# Altium PCB COPY.PcbDoc
Units mil, origin at the board's own origin, x right, y up, seen from the top; angles counter-clockwise.
Board outline 1320.03 x 2103.03 mil, 2 copper layers (Top Layer, Bottom Layer); 21 components, 11 nets, 54 pads, 4 vias.
Unrouted connection lines stored in the file: 10.
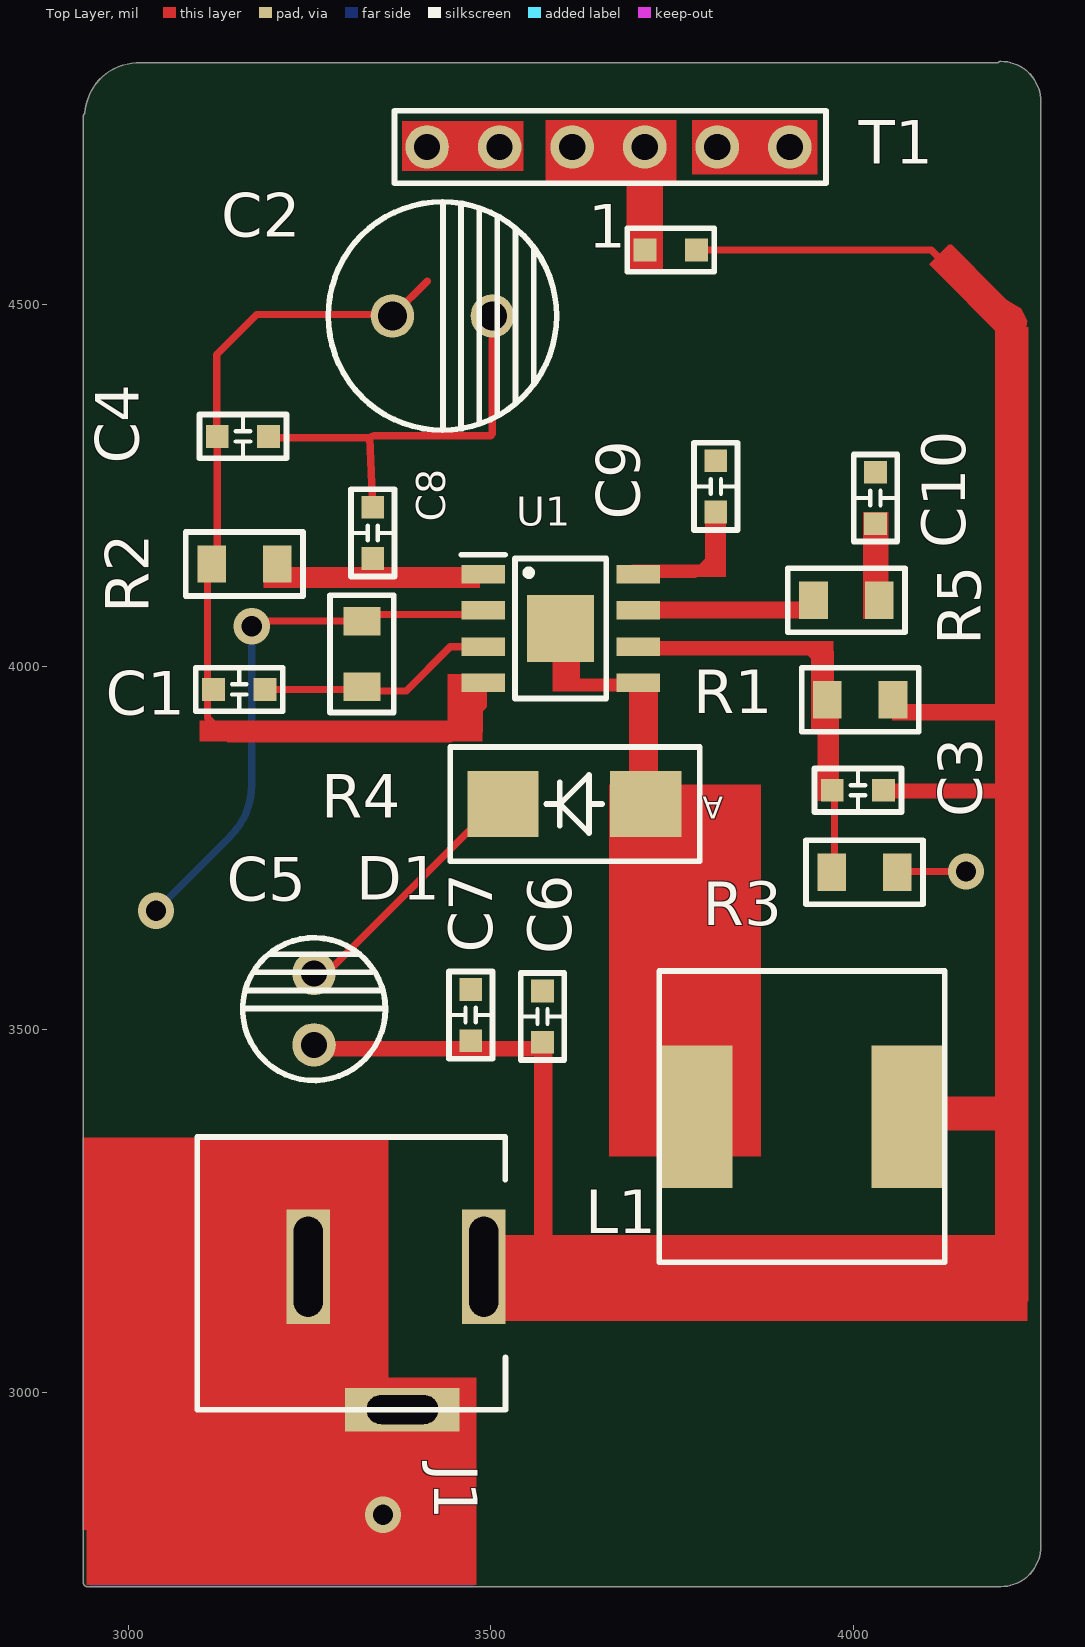
[diagram p0: Top Layer view]
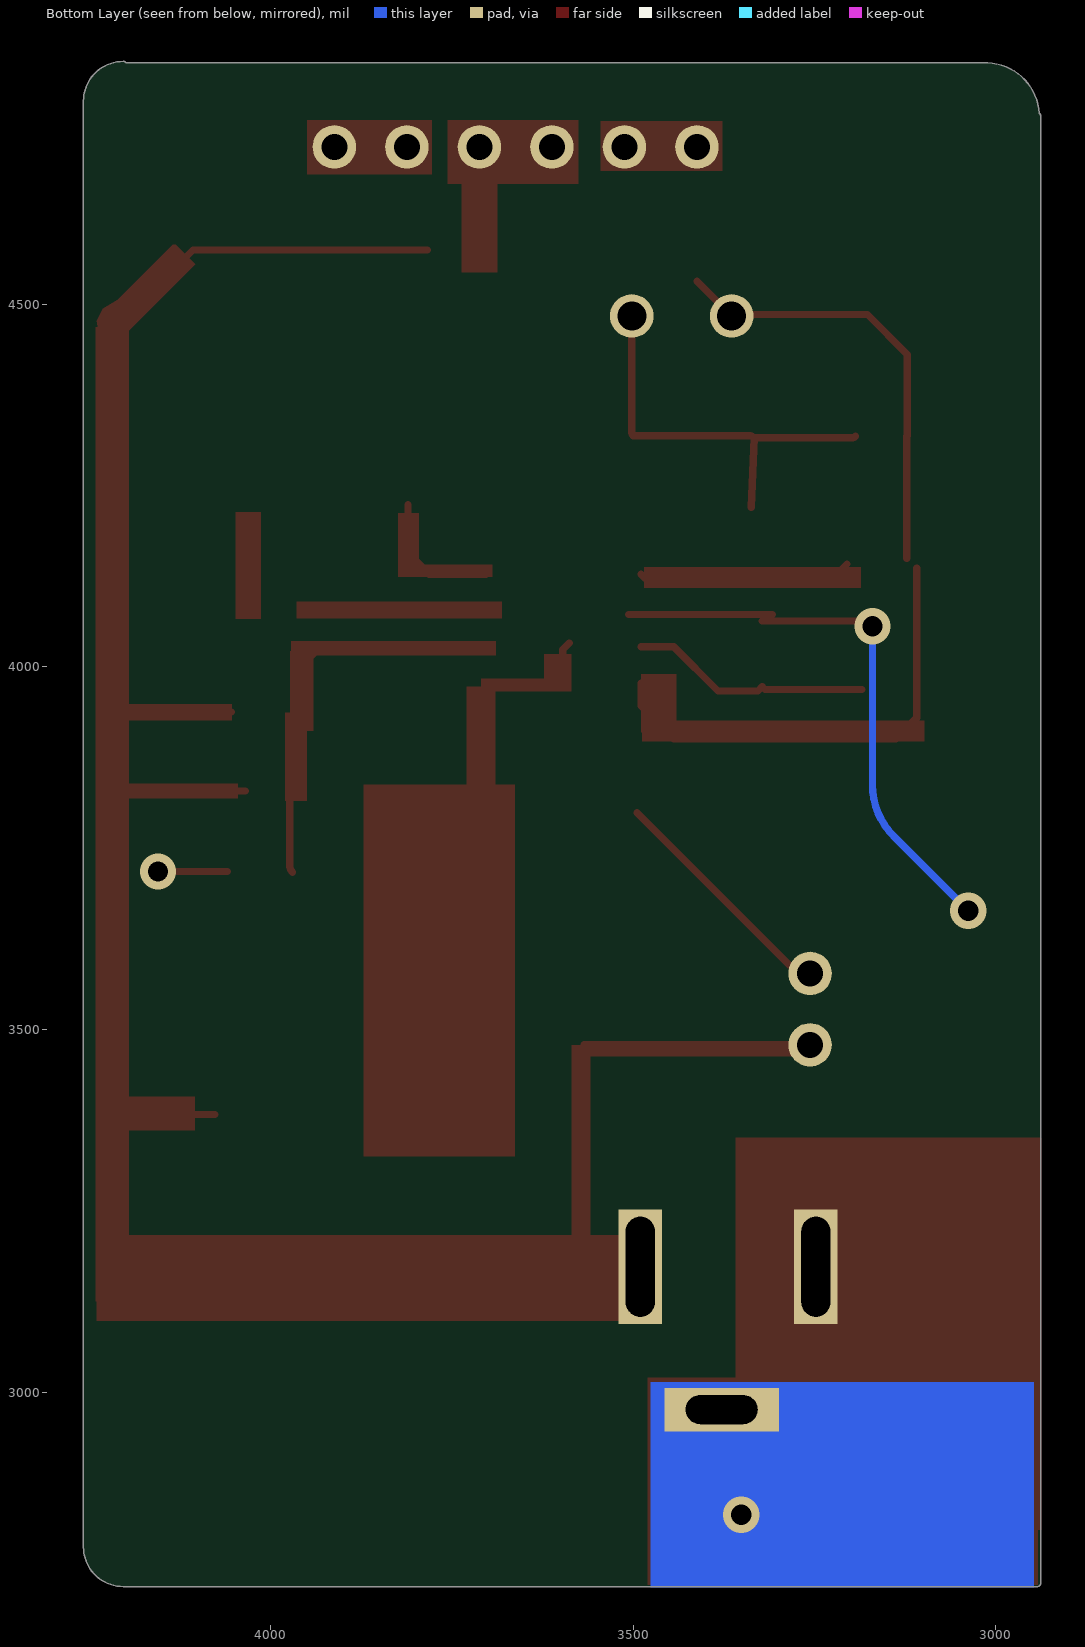
[diagram p1: Bottom Layer view, seen from below]
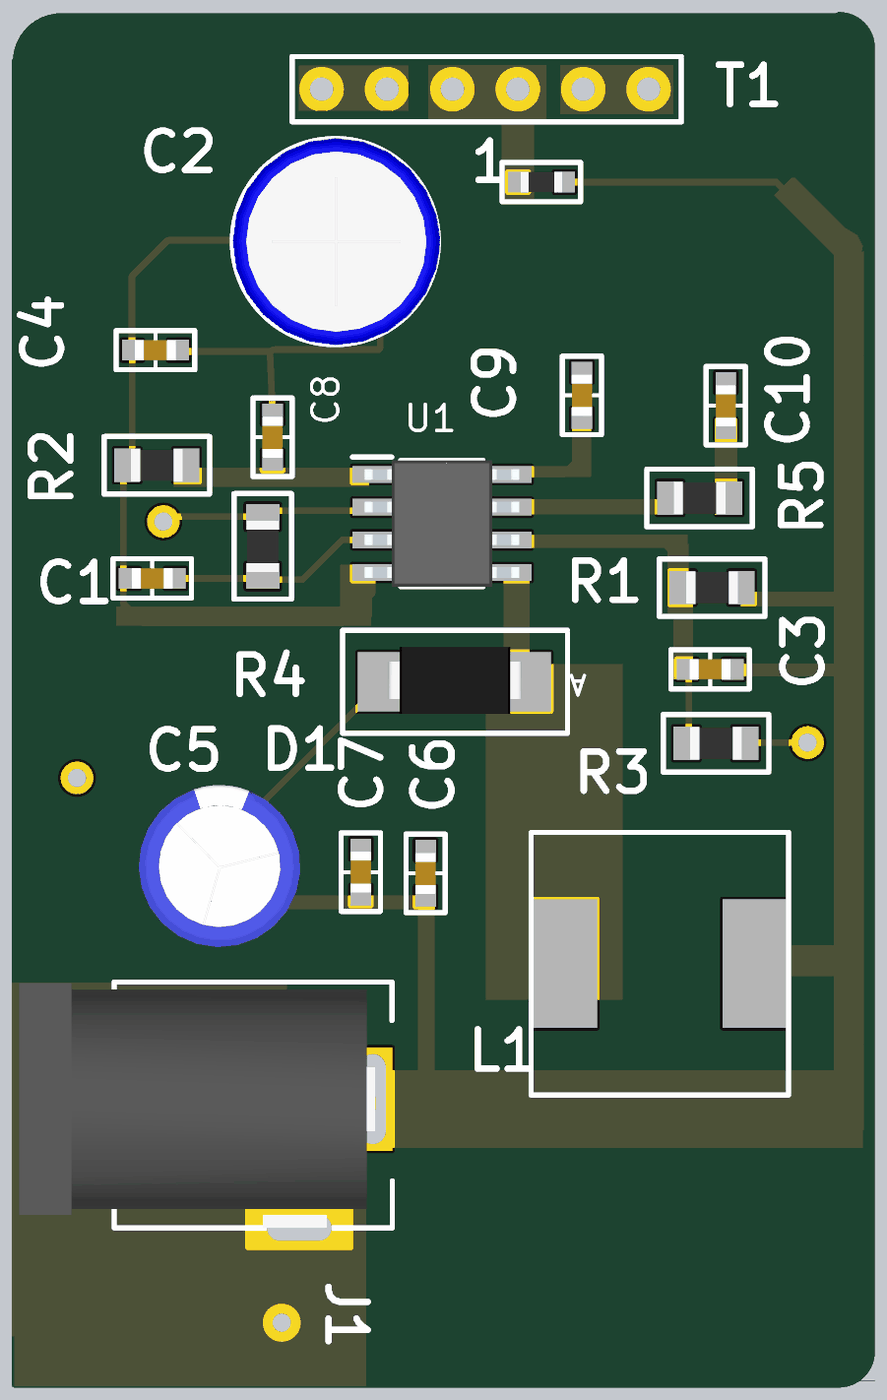
[diagram p2: 3D render of the assembled board from above, using the file's embedded part models]

## Layer stack, top to bottom
Top Solder: solder mask 0.4, Solder Resist, Dk 3.5
Top Layer: signal copper 1.4
Dielectric 1: dielectric 12.6, FR-4, Dk 4.8
Bottom Layer: signal copper 1.4
Bottom Solder: solder mask 0.4, Solder Resist, Dk 3.5

## Board outline
2937.99,2737 ccw(c2943,2737) 2943,2731.99 4203,2731.99 ccw(c4203,2787) 4258.02,2787 4258.02,4780 ccw(c4203,4780) 4203,4835.02 ccw(c4203,4830) 4198.99,4833.02 3011.71,4833.02 ccw(c3011.71,4828) 3011.01,4832.97 ccw(c3013.71,4759.38) 2940.19,4763.53 ccw(c2943,4759.38) 2937.99,4759.38

## Design rules (kind name [scope] priority, off if disabled: settings)
Clearance [All] p1: gap=10
PolygonConnect [All] p1: connectstyle=Relief reliefconductorwidth=10 reliefentries=4 polygonreliefangle="90 Angle" airgapwidth=10
RoutingVias [All] p1: holewidth=28 width=50 viastyle="Through Hole" minholewidth=28 minwidth=50 maxholewidth=28 maxwidth=50
SilkToBoardRegionClearance [All] p1 off:
SilkToSilkClearance [All] p1 off: silktosilkclearance=10
SolderMaskExpansion [All] p1: expansion=4
Width [All] p1: maxlimit=10 minlimit=10 preferedwidth=10
28 further rules are at their usual default settings.

## Components (designator, comment, footprint, x,y, rotation, side; value= is the part's Value field where it differs from the comment)
1 "R10" R_0603 3748,4575 r180 top
C1 "C0603" C_0603 3153,3969 r180 top
C2 "CAP" "CAP_ALLU 3.5mm" 3433,4484 r0 top
C3 "C0603" C_0603 4006,3830 r180 top
C4 "C0603" C_0603 3158,4318 r0 top
C5 "CAP" "CAP_ALLU 2.5mm" 3256,3479 r90 top
C6 "C0603" C_0603 3571,3518 r90 top
C7 "C0603" C_0603 3472,3520 r90 top
C8 "C0603" C_0603 3337,4184.88 r270 top
C9 "C0603" C_0603 3810,4249 r90 top
C10 "C0603" C_0603 4030,4233 r90 top
D1 "DIODE" Diode_SMB 3615,3811 r180 top
J1 "CONN JACK PWR" "DC Power Socket" 3248,3173 r180 top
L1 "INDUCTOR IRON/SM" Inductor 3929,3380 r0 top
R1 "RESISTOR" R_0805 4009,3954.9 r180 top
R2 "RESISTOR" R_0805 3160,4142 r0 top
R3 "RESISTOR" R_0805 4015,3717 r0 top
R4 "RESISTOR" R_0805 3322,4018 r90 top
R5 "RESISTOR" R_0805 3990,4092 r0 top
T1 "1X3PIN" HDR1X6_2.54mm 3912,4717 r180 top
U1 "AX3162" SO8E 3596,4053 r0 top

## Footprints (in the part's own frame and the unit in brackets; to place one, negate y for a bottom-side part, rotate by r counter-clockwise, add the part's x,y. Pads: shape width x height; smd on the part's side, far side on the other; paste and mask are expansions set on the pad)
C_0603 [mm]
  rect 0.8x0.8 smd: 1(-0.9,0) 2(0.9,0)
  silkscreen extent -1.52,-0.76 1.52,0.76, body extent -0.8,-0.4 0.8,0.4, height 0.9
"CAP_ALLU 2.5mm" [mil]
  round 60 hole 36: 1(0,0) 2(98.43,0)
  silkscreen extent -49,-98 148,98, body extent -74,-124 174,124, height 504
"CAP_ALLU 3.5mm" [mil]
  round 60 hole 40: 1(-68.9,0) 2(68.9,0)
  silkscreen extent -157,-157 157,157, body extent -157,-158 160,158, height 473
"DC Power Socket" [mil]
  rect 60x158 hole 40 slot 137.8 at 90 deg: 1(-242.13,0) 2(0,0)
  rect 158x60 hole 40 slot 99 at 0 deg: 3(-129.92,196.85)
  silkscreen extent -272,-179 153,197, body extent -246,-177 298,197, height 433
Diode_SMB [mm]
  rect 2.5x2.3 smd: 1(-2.5,0) 2(2.5,0)
  silkscreen extent -4.39,-2 4.34,2, body extent -2.62,-1.36 2.57,1.24, height 2.18
HDR1X6_2.54mm [mil] "Connector; Header; 6 Position"
  round 60 hole 36: 1(0,0) 2(100,0) 3(200,0) 4(300,0) 5(400,0) 6(500,0)
  silkscreen extent -50,-50 545,50
Inductor [mm] "Inductor 10.20 x 10"
  rect 2.5x5 smd: 1(-3.683,0) 2(3.683,0)
  silkscreen extent -5,-5.1 5,5.1, body extent -4.83,-4.95 4.83,4.95, height 5.1
R_0603 [mm] "RES SMD 0603"
  rect 0.8x0.8 smd: 1(-0.9,0) 2(0.9,0)
  silkscreen extent -1.52,-0.76 1.52,0.76, body extent -0.8,-0.4 0.8,0.4, height 0.4
R_0805 [mm] "RES SMD 0805"
  rect 1x1.3 smd: 1(-1.15,0) 2(1.15,0)
  silkscreen extent -2.05,-1.12 2.05,1.12, body extent -1,-0.62 1,0.63, height 0.5
SO8E [mm]
  rect 1.525x0.65 smd: 1(-2.712,1.905) 2(-2.712,0.635) 3(-2.712,-0.635) 4(-2.712,-1.905) 5(2.712,-1.905) 6(2.712,-0.635) 7(2.712,0.635) 8(2.712,1.905)
  rect 2.34x2.34 smd: 9(0,0)
  silkscreen extent -3.47,-2.45 1.6,2.58, body extent -3,-2.45 3,2.45, height 1.75

## Part data
1: library part RESISTOR

## Via types
v1: diameter 50, hole 28, Top Layer to Bottom Layer, 4 vias

## Nets (pads, with @x,y where several pads share a name; then routed paths per layer and width w, separated by ;. In a path a pad name is that pad's centre, name@x,y a point inside that pad or via, vN(x,y) a via of type N, cw(c..) or ccw(c..) an arc to the next point about the centre after c; other vN are vias at no path point)
12V: 1.1 C3.1 C5.1 C6.1 C7.1 J1.1 L1.2 R1.1 | length 3643.1
  Top Layer w10: C5.1 3567.43,3479 3567.43,3160.43 3566,3159 ; J1.1 3490.13,3159.13 3490.25,3159 3566,3159 ; 1.1 4107,4575 4219,4463 4219,3159 3566,3159 ; C3.1@4034.43,3829 4215,3829 ; R1.1@4054.28,3938 4218,3938 ; L1.2@4077,3383 4215,3383
GND: C2.2 C4.2 C5.2 C6.2 C7.2 C8.1 C9.2 C10.2 D1.2 J1.2 J1.3 R3.2 R4.2 T1.1 T1.2 U1.2 | length 1966.6
  Top Layer w10: v1(3170,4056) 3180,4056 3187.28,4063.28 R4.2 ; C4.2 ccw(c3198.26,4322.83) 3198.26,4316 3333,4316 ; C5.2 ccw(c3256,3618.47) 3285.02,3589.45 D1.2@3494.57,3799 ; R4.2@3308,4072.28 U1.2@3506,4072.28 ; C8.1 3333,4316 ; v1(3351,2831) 3351,2837 3377.92,2863.92 J1.3 ; C2.2 3501.9,4323.58 cw(c3495.42,4323.58) 3500,4319 3340.24,4319 ccw(c3340.24,4308.76) 3333,4316 ; R3.2@4059.28,3718 v1(4155,3718)
  Bottom Layer w10: v1(3038,3664) 3140.71,3766.71 ccw(c3070,3837.42) 3170,3837.42 v1(3170,4056) ; C5.2@3248,3558.11 cw(c3275.31,3558.11) C5.2
Net1_2: 1.2 T1.3 T1.4 | length 244.4
  Top Layer w10: T1.4 T1.3 3714,4715 1.2@3714,4573.43
NetC1_1: C1.1 R4.1 U1.3 | length 328.7
  Top Layer w10: C1.1@3184.43,3969 R4.1@3318.28,3969 ; R4.1 3327.72,3967 3383,3967 3444,4028 U1.3
NetC3_2: C3.2 R1.2 R3.1 U1.6 | length 552.7
  Top Layer w10: U1.6 3917,4028 3923,4022 3937,4022 3952.04,4006.96 3952.04,3992.96 3963.72,3981.28 R1.2 C3.2@3963.72,3829.16 ; R3.1 ccw(c3960.45,3726.28) 3973.57,3726.28 C3.2@3973.57,3828
NetC8_2: C8.2 R2.2 U1.1 | length 294.7
  Top Layer w10: R2.2 3225.28,4122 3483.23,4122 U1.1
NetC9_1: C9.1 U1.8 | length 186.4
  Top Layer w10: U1.8 3781,4128 3810.43,4157.43 C9.1@3810.43,4224
NetC10_1: C10.1 R5.2 | length 98.2
  Top Layer w10: R5.2@4026.43,4100.84 C10.1@4026.43,4199
NetD1_1: D1.1 L1.1 U1.5 U1.9 | length 771.9
  Top Layer w10: U1.9@3588,4033 3597,4024 3597,3994 3614.25,3976.75 3701.52,3976.75 U1.5 3702.77,3806.65 3706.43,3803 3830,3679.43 L1.1@3830,3415
NetR5_1: R5.1 U1.7 | length 228
  Top Layer w10: U1.7 R5.1@3930.72,4078
VIN: C1.2 C2.1 C4.1 R2.1 T1.5 T1.6 U1.4 | length 1361.4
  Top Layer w10: R2.1@3109,4136.28 3109,3930 3138,3901 3444,3901 3489.23,3946.23 U1.4 ; C4.1@3122,4318.57 3122,4431 3177,4486 3366.1,4486 3412,4531.9 ; R2.1@3122.57,4149.84 C4.1 ; T1.6 T1.5

## Other copper
Top Layer:
  rectangle net 12V: 4195,3125 4241,4469
  rectangle net 12V: 4053,3926 4201,3949
  rectangle net NetD1_1: 3663,3325 3872,3838
  rectangle net GND: 2937,2810 3359,3351
  rectangle net GND: 2942,2734 3480,3020
  rectangle net 12V: 3464,3098 4240,3217
  rectangle net 12V: 3559,3126 3585,3469
  rectangle net 12V: 3243,3463 3585,3479
  rectangle net VIN: 3098,3897 3488,3926
  rectangle net VIN: 3440,3910 3489,3990
  rectangle net NetC8_2: 3186,4109 3485,4138
  rectangle net NetC3_2: 3689,4016 3972,4036
  rectangle net NetR5_1: 3681,4067 3964,4090
  rectangle net NetC9_1: 3795,4124 3824,4212
  rectangle net NetC9_1: 3694,4124 3824,4141
  rectangle net NetC10_1: 4013,4066 4048,4214
  rectangle net NetC3_2: 3950,3815 3980,3937
  rectangle net NetC3_2: 3941,3912 3973,4022
  rectangle net Net1_2: 3575,4666 3756,4754
  rectangle net Net1_2: 3687,4544 3737,4695
  rectangle net 12V: 4045,3819 4215,3839
  rectangle net VIN: 3377,4684 3545,4753
  rectangle net NetD1_1: 3690,3798 3730,3973
  rectangle net GND: 3777,4679 3950,4754
  rectangle net NetD1_1: 3585,3966 3623,4018
  rectangle net NetD1_1: 3599,3966 3710,3984
  rectangle net 12V: 4104,3361 4212,3408
  region net 12V: 4210.71,4448.29 4104,4555 4131,4582 4135,4582 4142,4575 4194,4523 4210.71,4506.29 4231,4494 4239.71,4477.29 4236.81,4461.83
Bottom Layer:
  rectangle net GND: 2947,2731 3476,3014

## Silkscreen, mask and mechanical layers (free items; w line width, h text height)
Mechanical 1:
  lines w10: 2937,4756.38 2937,2734 4197,2734 ccw(c4197,2784) 4247,2784 4247,4777 ccw(c4197,4777) 4197,4827 ; 2939.09,4756.38 cw(c3007.71,4756.38) 3007.71,4825 ; 3005.71,4825 4198,4825

## Text inside footprints (layer, text, board x,y; h text height)
D1: Top Overlay "A" at 3820,3821 h30 r180